# Altium PCB SensWear-V1R1-MainBoard.PcbDoc (part 3 of 3)
Units mm, origin at the board's own origin, x right, y up, seen from the top; angles counter-clockwise.
Board outline 52.5 x 8.5 mm, 4 copper layers (Top Layer, Layer 1, Layer 2, Bottom Layer), stack 0.148 mm thick; 77 components, 63 nets, 291 pads, 132 vias.
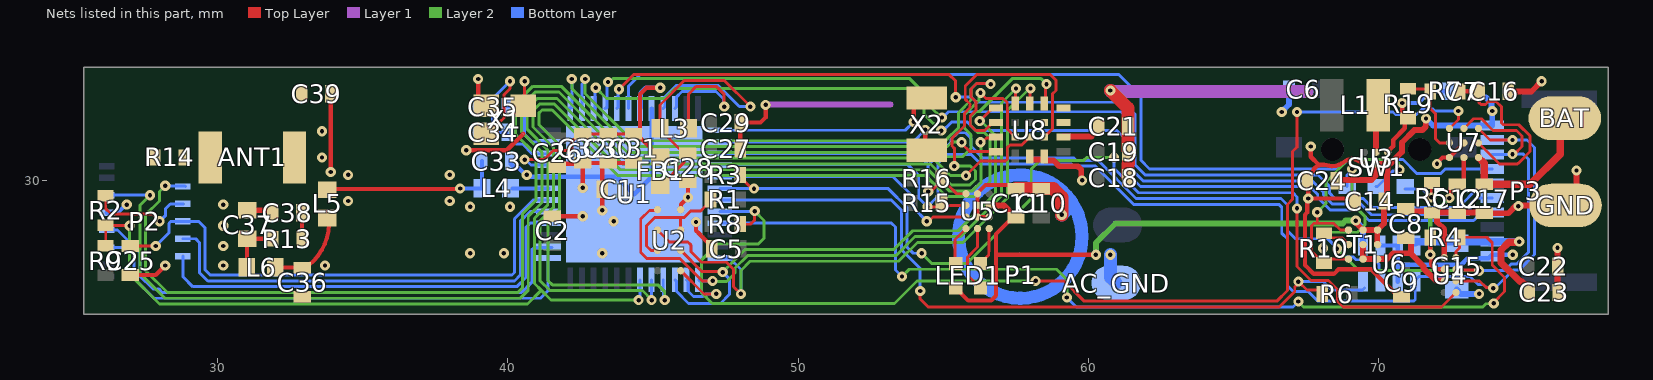
[diagram p4: the nets of this part, all layers, seen from the top]

## Via types
v1: diameter 0.35, hole 0.15, Top Layer to Bottom Layer, tented top, 75 vias
v2: diameter 0.35, hole 0.15, Top Layer to Bottom Layer, tented both sides, 57 vias

## Nets (pads, with @x,y where several pads share a name; then routed paths per layer and width w, separated by ;. In a path a pad name is that pad's centre, name@x,y a point inside that pad or via, vN(x,y) a via of type N, cw(c..) or ccw(c..) an arc to the next point about the centre after c; other vN are vias at no path point) (continued)
CHG_IRQ: R3.2 U1.6 U4.A1 | length 34.3
  Top Layer w0.1: R3.2@48,30.2 48,30.125 48.352,29.773 48.427,29.773 v2(48.475,29.725) ; v1(67.175,29.047) 67.175,27.049 67.659,26.565 68.264,26.565 68.575,26.254 68.575,25.838 68.763,25.65 72.15,25.65 U4.A1@72.65,26.15
  Layer 2 w0.1: v2(54.25,27.5) 54.599,27.151 55.801,27.151 58.025,29.375 58.025,30.4 58.325,30.7 59.835,30.7 59.935,30.8 v2(60.875,30.8)
  Bottom Layer w0.1: U1.6@47.302,29.736 47.307,29.731 48.469,29.731 v2(48.475,29.725) 53.1,29.725 53.75,29.075 53.75,27.708 53.958,27.5 v2(54.25,27.5) ; v2(60.875,30.8) 60.875,30.426 61.716,29.586 67.029,29.586 67.175,29.44 v1(67.175,29.047)
GAUGE_IRQ: R8.2 U1.8 U7.A1 | length 40.5
  Top Layer w0.1: R8.2@48,28.5 48.35,28.5 48.5,28.65 v2(48.5,28.95) ; v2(58.175,26.55) 59.15,26.55 59.85,25.85 66.48,25.85 66.85,26.22 66.85,29.182 67.025,29.357 67.025,31 67.175,31.15 v1(67.175,32.365) ; U7.A1@72.425,31.8 72.733,32.108 v1(72.733,32.4)
  Layer 2 w0.1: v2(48.5,28.95) 48.825,28.625 48.825,28.015 48.635,27.825 47.225,27.825 46.675,27.275 46.675,26.14 47.04,25.775 53.315,25.775 54.09,26.55 v2(58.175,26.55)
  Bottom Layer w0.1: U1.8@47.302,28.936 48.486,28.936 v2(48.5,28.95) ; v1(67.175,32.365) 70.484,32.365 70.574,32.275 71.295,32.275 71.485,32.465 71.86,32.465 71.925,32.4 v1(72.733,32.4)
GND: AC_GND.1 C1.2 C2.2 C5.1 C6.2 C7.1 C8.2 C9.2 C10.1 C11.2 C12.2 C14.1 C15.1 C16.2 C17.2 C18.1 C19.1 C21.2 C22.1 C23.1 C24.2 C25.1 C26.2 C27.2 C28.1 C29.2 C30.1 C31.1 C32.1 C33.2 C34.1 C35.1 C36.1 C37.1 C38.1 C39.2 GND.1 P1.2 P2.7 P3.10 R5.2 R19.2 U1.32 U1.44 U1.49 U2.D1 U3.A1 U3.C2 U4.D2 U5.A3 U5.B1 U5.B2 U5.B3 U6.2 U6.3 U6.6 U7.B2 U7.C1 U8.6 U8.7 X1.2 X1.4 | length 87.1
  Top Layer w0.15: C25.1@27,26.75 27.872,26.75 v1(28.2,27.078) ; C38.1@31.82,28.98 C38.1@31.9,28.9 ; v1@33.9,30.2 C39.2@33.9,33 ; v1(38.564,31.049) 39.593,31.049 39.964,31.049 X1.4@40.527,31.611 ; v1(38.975,33.501) 38.975,32.863 X1.2@39.252,32.586 ; C2.2@41.527,28.776 v1(42.577,28.776) ; C26.2@41.702,30.461 41.827,30.586 42.552,30.586 C32.1@42.577,30.611 ; v1(42.577,29.751) C32.1@42.577,30.611 ; v1(43.252,28.976) C1.2@43.252,29.701 43.252,30.486 C30.1@43.377,30.611 ; C31.1@44.327,30.611 C30.1@43.452,30.611 C30.1@43.377,30.611 ; U2.D1@45.952,29.001 45.962,29.012 45.962,29.186 v1(46.202,29.425) C28.1@46.202,29.951 ; v1(46.477,28.575) 46.477,28.281 46.605,28.153 46.708,28.05 46.883,27.875 46.9,27.875 47.025,27.75 C5.1@47.025,27.65 ; C27.2@48.002,31.101 C29.2@48.002,32.001 48.701,32.001 48.875,32.175 v1(48.875,32.611) ; U5.B2@56.15,29.175 U5.B2@56.175,29.15 ; U5.B1@56.175,29.525 U5.B2@56.175,29.15 ; U5.B1@56.175,29.55 56.175,29.574 56.451,29.85 57.375,29.85 C11.2@57.5,29.725 ; U5.A3@56.55,28.75 U5.B3@56.175,28.75 U5.B2@56.175,29.15 ; v1(67.65,31.177) 67.65,30.825 67.931,30.544 68.115,30.544 68.293,30.51 ccw(c68.4,31.075) 68.694,30.581 68.896,30.701 cw(c69.075,30.4) 69.237,30.71 U3.A1@69.5,30.575 ; 67.936,30.531 ccw(c68.05,30.2) 67.749,30.378 67.65,30.211 C24.2@67.525,30 67.565,29.96 v1(67.565,29.386) ; C14.1@69.175,29.3 69.089,29.386 v1(67.565,29.386) ; U3.C2@70.3,30.975 70.3,31.002 70.489,31.191 70.489,31.401 70.89,31.803 70.89,32.03 R19.2@71,32.14 70.925,32.14 70.8,32.265 70.8,32.353 v1(70.8,32.675) ; C9.2@70.775,26 70.675,26 69.725,26.95 68.607,26.95 68.447,26.79 67.753,26.79 67.45,27.093 67.45,28.828 67.525,28.903 67.525,29.205 67.526,29.206 67.526,29.347 v1(67.565,29.386) ; v1(72,30.579) 72,30.612 72.188,30.8 U7.C1@72.425,30.8 U7.B2@72.925,31.3 ; C32.1@42.577,30.611 C30.1@43.377,30.611
  Top Layer w0.2: C37.1@31.025,28.98 C38.1@31.82,28.98 ; U8.6@57.975,30.837 57.975,30.749 58,30.724 U8.7@58.475,30.724 ; U8.7@58.475,30.837 U8.7@58.475,30.724 ; v1(59.775,30.011) 59.746,30.04 59.746,30.383 59.629,30.5 58.993,30.5 58.793,30.7 58.5,30.7 U8.7@58.475,30.724 ; C8.2@70.925,28.95 R5.2@71.625,28.95 ; R5.2@71.8,28.85 71.95,28.85 72,28.8 72,28.573 72.25,28.323 U4.D2@72.25,27.35 ; R5.2@71.825,28.9 73.6,28.9 C17.2@73.625,28.875 74.456,28.875 74.731,29.15 GND.1@76.425,29.15 76.8,29.525 v1(76.8,30.35) ; C16.2@74.45,33.075 75.25,33.075 v1(75.6,33.425) ; v1(76.15,27.685) C22.1@76.15,27.05 76.15,26.175 C23.1@76.175,26.15
  Top Layer w0.45: C11.2@57.5,29.725 58.787,29.725 59.075,29.437 v1(59.075,28.825) ; v1(60.75,33.105) 61.35,32.505 C21.2@61.35,31.875 61.35,31.032 61.375,31.007 61.375,30.593 61.35,30.568 C18.1@61.35,30.1
  Layer 1 w0.2: v1@48.85,32.625 53.175,32.625
  Layer 1 w0.45: v1(60.75,33.105) 60.78,33.075 67.515,33.075
  Bottom Layer w0.15: P2.7@26.19,28.9 26.575,28.9 v1@26.875,29.2 ; C33.2@40.102,30.676 40.102,30.576 40.227,30.451 40.357,30.451 40.672,30.136 U1.32@41.402,30.136 43.752,30.136 U1.49@44.352,29.536 44.952,30.136 U1.44@44.952,32.486 ; U6.2@70.05,27.77 U6.3@70.65,27.77 70.65,27.105 ; U6.6@70.65,26.525 70.65,27.105 ; v1(70.8,32.675) 71.36,32.675 71.76,33.075 C7.1@72.375,33.075 ; v1(74.605,27.45) 73.9,27.45 73.776,27.326 73.051,27.326 72.83,27.105 70.65,27.105
  Bottom Layer w0.2: v1(66.65,32.365) 66.65,32.37 66.9,32.62 C6.2@66.9,33.15 ; C15.1@72.675,26.25 72.825,26.1 v1(73.45,26.1)
  Bottom Layer w0.45: v1(59.075,28.825) 59.3,29.05 59.475,29.05 ; v1(60.75,27.45) 60.761,27.439 60.761,26.664 AC_GND.1@60.95,26.475
  other v1: 30.2,27.078 33.7,27.078 38.7,27.5 39.864,27.5 43.252,27.5 30.2,27.75 30.2,28.45 43.643,28.602 38.7,29.1 40.075,29.1 74.8,29.125 26.875,29.175 30.2,29.175 34.5,29.3 38,29.3 34.5,30.2 38,30.2 40.65,30.2 33.9,30.3 33.6,30.8 33.6,31.7
LED_EN: U1.5 U5.C3 | length 9.4
  Top Layer w0.1: v1(54.425,28.6) 54.493,28.6 54.643,28.75 U5.C3@55.75,28.75
  Bottom Layer w0.1: U1.5@47.302,30.136 53.264,30.136 53.95,29.45 53.95,29.075 v1(54.425,28.6)
MCU_R\E\S\E\T\: C25.2 P2.6 U1.30 | length 18.7
  Top Layer w0.1: C25.2@27,27.75 v2(27.875,27.75)
  Bottom Layer w0.1: v2(27.875,27.75) 28.333,28.208 28.333,28.532 28.401,28.6 P2.6@28.81,28.6 29.35,28.6 29.575,28.375 29.575,26.925 29.75,26.75 40.14,26.75 40.225,26.835 40.225,28.687 40.875,29.336 U1.30@41.402,29.336
MCU_RX: P2.2 U1.28 | length 15.4
  Bottom Layer w0.1: P2.2@28.81,27.4 28.81,26.69 29.15,26.35 40.306,26.35 40.625,26.669 40.625,28.395 40.767,28.536 U1.28@41.402,28.536
MCU_SWD_CLK: P2.5 U1.26 | length 18
  Bottom Layer w0.1: P2.5@26.19,28.3 26.558,28.3 27.325,27.533 27.325,26.725 27.775,26.275 27.975,26.275 28.1,26.15 40.475,26.15 40.825,26.5 40.825,27.625 40.9,27.7 U1.26@41.526,27.7
MCU_SWD_IO: P2.3 U1.25 | length 17.6
  Bottom Layer w0.1: P2.3@26.19,27.7 26.875,27.7 27.125,27.45 27.125,26.642 27.817,25.95 41.128,25.95 41.377,26.198 41.377,27.311 U1.25@41.402,27.336
MCU_TX: P2.4 U1.29 | length 15.9
  Bottom Layer w0.1: P2.4@28.81,28 29.25,28 29.375,27.875 29.375,26.95 29.375,26.842 29.667,26.55 30,26.55 39.9,26.55 40.223,26.55 40.425,26.752 40.425,27.075 40.425,28.604 40.758,28.936 U1.29@41.392,28.936
MEM_SPI_C\S\: U1.14 U2.A1 | length 3.1
  Top Layer w0.1: U2.A1@45.952,26.901 46.753,26.1 v2(47.175,26.1)
  Bottom Layer w0.1: U1.14@46.152,26.586 46.202,26.536 46.202,26.198 46.389,26.011 46.714,26.011 46.803,26.1 v2(47.175,26.1)
MPU_CLK: U1.12 U2.C2 U8.13 | length 21.6
  Top Layer w0.1: U2.C2@45.152,28.301 45.563,27.89 46.202,27.89 46.302,27.79 46.302,27.56 46.669,27.192 47.533,27.192 47.775,26.95 47.775,26.35 v2(48.025,26.1) ; U8.13@57.975,32.687 57.988,32.699 57.988,33.163 v2(58,33.175)
  Layer 2 w0.1: v2(48.025,26.1) 48.025,26.909 48.341,27.225 48.883,27.225 53.458,27.225 54.108,27.875 55.676,27.875 57.2,29.399 57.2,32.415 57.96,33.175 v2(58,33.175)
  Bottom Layer w0.1: U1.12@47.302,27.336 47.627,27.336 48.025,26.938 v2(48.025,26.1)
MPU_CS#: U1.16 U8.12 | length 35
  Top Layer w0.1: U8.12@58.475,32.687 58.512,32.724 58.512,33.288 v2(58.55,33.325)
  Layer 2 w0.1: v2(45.402,25.888) 45.402,26.173 45.162,26.413 41.53,26.413 41.377,26.566 41.377,28.602 41.775,29 41.775,31.225 41.067,31.933 41.067,32.325 41.176,32.434 41.526,32.434 43.785,30.175 53.668,30.175 53.672,30.172 54.388,30.172 55.11,29.45 55.878,29.45 56.075,29.45 56.6,29.975 56.6,31.46 56.41,31.65 56.19,31.65 55.925,31.915 55.925,32.185 56.115,32.375 56.234,32.375 57.384,33.525 58.35,33.525 v2(58.55,33.325)
  Bottom Layer w0.1: U1.16@45.352,26.586 45.352,25.938 v2(45.402,25.888)
MPU_GPIO0: U1.38 U8.2 | length 20.8
  Top Layer w0.1: v2@56.625,33.35 56.14,33.35 55.95,33.16 55.95,32.89 56.116,32.724 56.116,32.415 55.925,32.224 55.925,31.915 56.115,31.725 56.425,31.725 56.7,32 U8.2@56.812,32
  Layer 2 w0.1: v2(42.66,33.501) 42.66,32.998 44.282,31.375 55.06,31.375 55.289,31.604 55.296,31.604 55.525,31.834 55.525,32.35 55.95,32.775 55.95,33.16 56.14,33.35 v2@56.625,33.35
  Bottom Layer w0.1: U1.38@42.55,32.488 42.55,32.86 42.552,32.861 42.552,33.325 42.66,33.433 v2(42.66,33.501)
  other v2: 56.625,33.325
MPU_GPIO1: U1.17 U8.3 | length 30
  Top Layer w0.1: v2(56.275,31.325) 56.343,31.325 56.485,31.467 56.641,31.467 U8.3@56.675,31.5
  Layer 2 w0.1: v2(44.952,25.888) 44.952,25.897 44.636,26.213 41.448,26.213 41.113,26.547 41.113,28.621 41.575,29.083 41.575,31.142 40.867,31.851 40.867,32.408 41.093,32.634 41.609,32.634 43.868,30.375 54.475,30.375 55.2,29.65 55.569,29.65 55.795,29.65 55.992,29.65 56.3,29.958 56.3,30.155 56.3,30.381 56.3,31.3 v2(56.275,31.325)
  Bottom Layer w0.1: v2@44.95,25.786 44.952,25.788 v2(44.952,25.888) U1.17@44.952,26.586
MPU_GPIO2: U8.10
MPU_GPIO3: U8.11
MPU_GPIO4: U8.18
MPU_IRQ#: U1.37 U8.4 | length 17
  Top Layer w0.1: v2(55.625,31.325) 55.625,31.28 55.905,31 U8.4@56.787,31
  Layer 2 w0.1: v2(42.203,33.501) 42.203,33.172 44.199,31.175 55.142,31.175 55.292,31.325 v2(55.625,31.325)
  Bottom Layer w0.1: U1.37@42.127,32.511 U1.37@42.152,32.486 ; U1.37@42.202,32.511 v2@42.202,33.477
MPU_MISO: U1.15 U2.B1 U8.1 | length 19.2
  Top Layer w0.1: U2.B1@45.952,27.601 46.678,26.875 47.375,26.875 v2(47.4,26.85) ; v2(56.25,32.05) 56.625,32.425 56.7,32.5 U8.1@56.812,32.5
  Layer 2 w0.1: v2(47.4,26.85) 48.175,27.625 53.292,27.625 53.942,28.275 55.511,28.275 56.8,29.564 56.8,31.542 56.292,32.05 v2@56.258,32.05
  Bottom Layer w0.1: U1.15@45.752,26.586 45.802,26.536 45.802,26.198 46.225,25.775 47.325,25.775 47.627,26.077 47.627,26.623 v2(47.4,26.85)
MPU_MOSI: U1.13 U2.D2 U8.14 | length 21
  Top Layer w0.1: U2.D2@45.152,29.026 45.102,28.976 44.877,28.976 44.577,28.676 44.577,27.526 44.777,27.326 45.915,27.326 46.692,26.55 v2(47.05,26.55) ; U8.14@57.475,32.687 57.487,32.699 57.487,33.163 v2(57.5,33.175)
  Layer 2 w0.1: v2@47.025,26.55 47.05,26.525 47.535,26.525 47.825,26.815 47.825,26.992 48.258,27.425 53.375,27.425 54.025,28.075 55.594,28.075 57,29.481 57,29.809 57,32.675 v2(57.5,33.175)
  Bottom Layer w0.1: U1.13@46.577,26.675 46.577,26.575 46.602,26.55 v2(47.05,26.55)
MPU_R\E\S\E\T\: R2.1 R9.2 U1.18 U8.17 | length 55.6
  Top Layer w0.1: R9.2@26.15,27.76 R2.1@26.15,28.465 26.165,28.45 v2@26.95,28.45 ; v2(55.375,30.5) 55.375,31.115 55.3,31.19 55.3,31.46 55.725,31.885 55.725,32.325 55.916,32.516 55.916,32.641 55.75,32.808 55.75,33.265 56.135,33.65 58.685,33.65 58.875,33.46 58.875,33.105 58.751,32.98 58.751,31.775 U8.17@58.475,31.5
  Layer 2 w0.1: v2(26.975,28.45) 26.975,26.775 28,25.75 40.675,25.75 41.151,26.226 ; v2(44.502,25.888) 41.49,25.888 41.151,26.226 ; v2(55.375,30.5) 55.936,30.5 56.1,30.336 56.1,30.238 56.1,30.04 55.91,29.85 55.712,29.85 55.283,29.85 54.558,30.575 43.951,30.575 41.692,32.834 41.01,32.834 40.667,32.491 40.667,31.768 41.375,31.059 41.375,29.166 40.913,28.704 40.913,26.464 41.151,26.226
  Bottom Layer w0.1: v2(44.502,25.888) 44.552,25.938 U1.18@44.552,26.586
MPU_SWD_CLK: P2.10 U8.15 | length 45.7
  Top Layer w0.1: v2(56.275,33.025) 56.468,32.832 57.054,32.832 57.2,32.687 57.2,32.425 ; 57.2,32.425 57.2,31.775 57.45,31.525 U8.15@57.475,31.525
  Layer 2 w0.1: v2(28.2,29.825) 28,29.625 28,29.3 27.525,28.825 27.525,26.9 28.275,26.15 40.342,26.15 40.502,26.31 40.502,28.858 40.975,29.331 40.975,30.894 40.267,31.602 40.267,32.656 40.86,33.25 41.842,33.25 44.117,30.975 54.948,30.975 55.098,30.825 55.66,30.825 55.95,31.115 55.95,31.579 55.725,31.804 55.725,32.267 56.227,32.77 56.227,32.977 v2(56.275,33.025)
  Bottom Layer w0.1: v2(28.2,29.825) 28.212,29.813 28.887,29.813 P2.10@28.9,29.8
MPU_SWD_DIO: P2.9 U8.16 | length 44.7
  Top Layer w0.1: v2(55.775,30.175) 56.275,30.675 57.141,30.675 57.2,30.733 57.2,31.136 57.288,31.225 57.7,31.225 U8.16@57.975,31.5
  Layer 2 w0.1: v2(27.675,29.5) 27.325,29.15 27.325,26.817 28.192,25.95 40.425,25.95 40.702,26.227 40.702,28.775 41.175,29.249 41.175,30.976 40.467,31.685 40.467,32.574 40.943,33.05 41.759,33.05 44.034,30.775 54.64,30.775 55.24,30.175 v2(55.775,30.175)
  Bottom Layer w0.1: P2.9@26.19,29.5 v2(27.675,29.5)
NetANT1_1: ANT1.1 C38.2 C39.1 R13.2 R14.1 | length 0.9
  Top Layer w0.14: C38.2@32.9,28.9 32.91,28.89 R13.2@32.91,27.985
NetANT1_2: ANT1.2 R14.2
NetC16_1: C16.1 R7.2 U7.B3 | length 6.5
  Top Layer w0.1: U7.B3@73.425,31.3 74.15,30.575 74.772,30.575 74.797,30.6 74.806,30.6 74.997,30.79 74.997,30.8 75.197,31 75.197,31.544 74.814,31.926 74.284,31.926 74.225,31.985 74.225,32.535 74.035,32.725 73.765,32.725 73.667,32.626 73.509,32.626 73.45,32.685 C16.1@73.45,33.075
  Top Layer w0.15: R7.2@72.785,33.075 C16.1@73.45,33.075
NetC21_1: C21.1 U8.9 | length 1.2
  Top Layer w0.2: U8.9@59.138,31.525 60.1,31.525 60.25,31.675 C21.1@60.25,31.75
NetC28_2: C28.2 FB1.2 L3.1 U1.45 | length 11.2
  Top Layer w0.1: FB1.2@45.252,29.836 45.282,29.836 46.059,30.614 46.059,31.009 C28.2@46.077,31.026 ; C28.2@46.077,31.076 45.932,31.076 45.237,31.771 L3.1@45.237,31.801 45.237,32.611 46.075,33.45 47.453,33.45 v2(48.352,32.551)
  Bottom Layer w0.1: U1.45@45.352,32.486 45.402,32.536 45.402,32.876 45.8,33.275 47.247,33.275 47.971,32.551 v2(48.352,32.551)
NetC30_2: C30.2 C31.2 C32.2 FB1.1 U1.33 U1.43 | length 9.9
  Top Layer w0.1: v2(40.577,30.726) 41.254,30.726 41.563,31.035 42.136,31.035 42.203,31.101 42.203,31.337 42.477,31.611 C30.2@43.452,31.611 44.217,31.611 C31.2@44.327,31.611
  Top Layer w0.15: C31.2@44.102,31.486 44.217,31.601 C31.2@44.227,31.601 ; C31.2@44.482,31.556 44.552,31.486 45.222,30.816 FB1.1@45.252,30.816 ; C31.2@44.527,31.601 44.552,31.626 44.552,32.977 44.775,33.2 v2(45.25,33.2)
  Bottom Layer w0.1: v2(40.577,30.726) 40.603,30.726 40.793,30.536 U1.33@41.402,30.536
  Bottom Layer w0.15: U1.43@44.552,32.486 44.577,32.511 44.577,33.027 44.75,33.2 v2(45.25,33.2)
NetC33_1: C33.1 L4.2 L5.1 | length 6.2
  Top Layer w0.14: L5.1@33.775,29.715 v2@38.34,29.715
  Bottom Layer w0.14: v2(38.357,29.731) L4.2@39.107,29.731 ; L4.2@39.107,29.771 C33.1@39.107,30.671
NetC34_2: C34.2 U1.34 X1.3 | length 6.5
  Top Layer w0.1: X1.3@39.252,31.611 39.302,31.611 39.739,32.049 39.751,32.049 39.864,32.161 39.864,32.961 40.072,33.169 40.072,33.422 v2(40.075,33.425)
  Bottom Layer w0.1: v2(40.075,33.425) 39.477,32.827 39.477,31.761 39.577,31.661 C34.2@39.977,31.661 39.977,31.561 40.277,31.261 40.502,31.261 40.836,30.926 U1.34@41.452,30.926
NetC35_2: C35.2 U1.35 X1.1 | length 4.2
  Top Layer w0.1: X1.1@40.527,32.586 40.577,32.636 v2(40.577,33.426)
  Bottom Layer w0.1: C35.2@39.977,32.551 40.577,32.551 ; v2(40.577,33.426) 40.577,32.551 ; U1.35@41.402,31.336 40.842,31.336 40.577,31.601 40.577,32.551
NetC36_2: C36.2 L5.2 L6.1 | length 3
  Top Layer w0.14: L6.1@32.002,27.013 C36.2@32.925,27.013 ; C36.2@32.925,27 33.155,27.096 ccw(c31.922,28.568) 33.841,28.49 L5.2@33.775,28.76
NetC37_2: C37.2 L6.2 R13.1 | length 1.8
  Top Layer w0.14: L6.2@31.01,27.025 31.017,27.033 31.017,27.942 C37.2@31.025,27.95 ; C37.2@31.025,28 R13.1@31.9,28
NetL1_1: L1.1 U3.B2 | length 1.9
  Top Layer w0.15: L1.1@69.9,32.85 L1.1@69.925,32.875
  Top Layer w0.2: U3.B2@69.9,30.975 L1.1@69.9,32.85
NetL3_2: L3.2 U1.46 | length 5.6
  Top Layer w0.1: L3.2@46.217,31.801 46.217,32.977 46.49,33.25 47.177,33.25 47.45,32.977 v2(47.45,32.55)
  Bottom Layer w0.1: U1.46@45.752,32.486 45.802,32.536 45.802,32.876 46,33.075 47.164,33.075 47.424,32.815 47.424,32.576 v2(47.45,32.55)
NetL4_1: L4.1 U1.31 | length 1.2
  Bottom Layer w0.14: L4.1@40.162,29.736 U1.31@41.402,29.736
NetLED1_2: LED1.2 U5.C4 | length 1.4
  Top Layer w0.1: LED1.2@55.4,27.15 55.4,27.975 U5.C4@55.775,28.35
NetLED1_3: LED1.3 U5.A4 | length 1.3
  Top Layer w0.1: LED1.3@56.275,27.15 56.562,27.437 56.562,27.562 56.575,27.575 U5.A4@56.575,28.35
NetLED1_4: LED1.4 U5.B4 | length 2.4
  Top Layer w0.1: U5.B4@56.175,28.35 56.175,27.712 55.825,27.362 55.825,26.75 56.25,26.325 LED1.4@56.25,26.3
NetP2_8: P2.8 R2.2 | length 3.7
  Top Layer w0.1: R2.2@26.15,29.485 26.15,29.03 26.33,28.85 27.758,28.85 v2(28.008,28.6)
  Bottom Layer w0.1: v2(28.008,28.6) 28.215,28.807 28.215,29.04 28.375,29.2 P2.8@28.825,29.2
NetR1_1: R1.1 U2.B2 U2.C1 | length 4.2
  Top Layer w0.1: U2.B2@45.152,27.601 44.927,27.601 44.777,27.751 44.777,28.451 45.052,28.726 45.952,28.726 ; U2.C1@45.952,28.301 45.952,28.726 ; R1.1@47.03,29.35 47.03,29.325 46.83,29.125 46.805,29.125 46.63,28.95 46.289,28.95 46.065,28.726 45.952,28.726
NetR5_1: R5.1 SW1.2 | length 1.5
  Top Layer w0.1: v1(71.8,29.425) 71.8,29.895 R5.1@71.825,29.92
  Bottom Layer w0.1: SW1.2@70.9,29.72 71.48,29.72 v1@71.8,29.4
NetR7_1: R7.1 R19.1 U7.B1 | length 3
  Top Layer w0.1: R19.1@71,33.16 71.68,33.16 R7.1@71.765,33.075 71.765,32.49 71.95,32.305 71.95,31.442 72.092,31.3 U7.B1@72.425,31.3
NetR10_1: R10.1 SW1.C T1.A1 T1.C1 | length 9.3
  Top Layer w0.1: v1(67.875,28.913) 67.875,28.535 ; R10.1@68,27.15 67.875,27.275 67.875,27.371 67.675,27.571 67.675,28.447 67.763,28.535 67.875,28.535 ; R10.1@68.2,27.2 68.3,27.3 T1.C1@68.95,27.3 ; T1.A1@68.95,28.3 68.672,28.3 68.437,28.535 67.875,28.535
  Layer 2 w0.1: v1(67.875,28.913) 68.172,29.21 68.172,29.956 68.94,30.725 70.544,30.725 70.67,30.599 70.67,30.417 v1(70.709,30.378)
  Bottom Layer w0.1: SW1.C@69.9,29.795 69.945,29.795 70.489,30.339 70.67,30.339 v1(70.709,30.378)
NetR10_2: R10.2 SW1.1 T1.B1 | length 6.2
  Top Layer w0.1: v1@68.1,27.65 R10.2@68.1,28.185 ; R10.2@68.15,28.05 68.165,28.035 68.715,28.035 T1.B1@68.95,27.8
  Layer 2 w0.1: v1@68.1,27.675 68.1,28.075 68.25,28.225 69.26,28.225 69.525,28.49 69.525,28.76 69.075,29.21 v1(69.075,30.4)
  Bottom Layer w0.1: SW1.1@68.9,29.795 68.9,30.2 69.075,30.375 v1(69.075,30.4)
  other v1: 68.075,27.675
NetU1_1: U1.1 X2.2 | length 8.2
  Top Layer w0.1: X2.2@54.425,32.825 X2.2@54.625,32.625
  Top Layer w0.15: v2(53.975,32.025) 53.975,32.625 54.05,32.7 X2.2@54.05,33.075
  Bottom Layer w0.1: U1.1@47.302,31.736 53.686,31.736 53.95,32 v2@54.025,32
NetU1_2: U1.2 X2.1 | length 8
  Top Layer w0.1: X2.1@53.875,30.825 X2.1@53.925,30.775
  Top Layer w0.15: v2(54.375,31.75) 54.375,31.125 X2.1@54.425,31.075
  Bottom Layer w0.1: U1.2@47.302,31.336 53.961,31.336 54.35,31.725 v2@54.375,31.725
  Bottom Layer w0.15: v2@54.362,31.737 v2(54.375,31.75)
PWR_I2C_SCL: P3.2 R15.2 U1.4 U4.B1 U5.C2 U6.5 U7.A3 | length 44.8
  Top Layer w0.1: v1(54.45,29.1) 54.975,29.1 R15.2@55,29.075 ; R15.2@55,29.175 55.025,29.15 U5.C2@55.775,29.15 ; U4.B1@72.65,26.55 73.46,26.55 73.693,26.317 73.918,26.317 v1(73.935,26.3) ; U7.A3@73.425,31.8 73.824,31.401 v1@74.672,31.401
  Bottom Layer w0.1: U1.4@47.302,30.536 47.317,30.551 53.774,30.551 54.15,30.175 54.15,29.4 v1(54.45,29.1) 54.818,29.468 54.818,30.593 55.125,30.9 55.958,30.9 56.283,30.575 59.408,30.575 59.483,30.5 60.236,30.5 61.55,29.186 66.546,29.186 66.65,29.082 66.65,28.19 66.85,27.99 66.85,26.382 67.049,26.183 67.565,26.183 67.898,25.85 71.191,25.85 71.25,25.909 U6.5@71.25,26.425 ; U6.5@71.25,26.525 71.25,26.573 71.377,26.7 73.137,26.7 73.412,26.425 73.585,26.425 73.693,26.317 73.918,26.317 v1(73.935,26.3) 74,26.3 74.625,26.925 74.813,26.925 74.838,26.95 74.847,26.95 75.356,27.458 75.356,31.141 75.097,31.4 P3.2@73.9,31.4
  other v1: 74.597,31.401
PWR_I2C_SDA: P3.3 R16.2 U1.3 U4.C1 U5.C1 U6.7 U7.A2 | length 44.8
  Top Layer w0.1: v1(54.475,29.625) 54.523,29.673 54.608,29.673 54.925,29.99 R16.2@54.925,30.075 ; R16.2@54.935,30.075 54.935,30 55.085,29.85 55.16,29.85 55.46,29.55 U5.C1@55.775,29.55 ; U4.C1@72.65,26.95 72.675,26.925 73.425,26.925 v1(73.45,26.9) ; U7.A2@72.925,31.8 73.257,32.132 73.526,32.132 73.931,31.726 74.731,31.726 74.922,31.536 74.922,31.175 74.66,30.913 v1(74.597,30.913)
  Layer 2 w0.1: v1(68.552,27.658) 69.31,26.9 v1(73.45,26.9)
  Bottom Layer w0.1: U1.3@47.302,30.936 47.312,30.926 54.09,30.926 54.475,30.541 ; v1(54.475,29.625) 54.475,30.541 ; U6.7@70,26.675 70,27.125 69.848,27.277 69.211,27.277 69.123,27.365 68.869,27.365 68.235,28 67.123,28 66.85,28.273 66.85,29.165 66.629,29.386 61.633,29.386 60.319,30.7 59.565,30.7 59.49,30.775 56.365,30.775 55.95,31.19 55.95,31.46 55.76,31.65 55.49,31.65 55.262,31.422 55.262,31.328 54.475,30.541 ; v1(73.45,26.9) 74.317,26.9 74.542,27.125 74.74,27.125 75.156,27.541 75.156,30.726 74.969,30.913 v1(74.597,30.913) 74.584,30.9 P3.3@73.9,30.9
PWR_K\I\L\L\: R4.1 U1.9 U4.D1 | length 33.9
  Top Layer w0.1: U4.D1@72.65,27.35 72.655,27.355 72.655,27.565 72.775,27.685 R4.1@72.775,28.1 ; R4.1@72.785,28.05 73.711,28.05 73.9,27.861 73.9,27.093 74.325,26.668 74.325,26.184 73.95,25.809 v1(73.95,25.775)
  Layer 2 w0.1: v2(53.575,26.7) 53.826,26.951 58.899,26.951 59.25,26.6 v2(59.25,25.975) ; v1(67.223,25.838) 67.223,25.827 67.4,25.65 73.575,25.65 73.685,25.76 v1@73.935,25.76
  Bottom Layer w0.1: U1.9@47.302,28.536 53.214,28.536 53.35,28.4 53.35,26.925 v2(53.575,26.7) ; v2(59.25,25.975) 59.575,25.65 67.035,25.65 v1(67.223,25.838) ; v1@73.935,25.76 v1(73.95,25.775)
SENSOR_GPIO_0: P3.4 U1.42 | length 33.7
  Bottom Layer w0.1: U1.42@44.152,32.486 44.152,33.252 44.275,33.375 44.55,33.65 61.05,33.65 61.8,32.9 61.8,30.7 62.1,30.4 67.983,30.4 68.503,30.4 68.704,30.601 68.816,30.601 68.94,30.725 70.822,30.725 71.293,30.254 72.135,30.254 72.281,30.4 P3.4@73.9,30.4
SENSOR_GPIO_1: P3.5 U1.41 | length 34.7
  Top Layer w0.1: v2(43.825,33.15) 44.325,33.65 55.2,33.65 55.422,33.428 55.422,32.878 v2(55.425,32.875)
  Bottom Layer w0.1: U1.41@43.752,32.486 43.796,32.53 43.796,33.121 v2(43.825,33.15) ; v2(55.425,32.875) 55.965,32.875 56.14,32.7 61.2,32.7 61.6,32.3 61.6,30.55 61.95,30.2 67.9,30.2 68.29,29.811 68.29,29.585 68.485,29.39 69.46,29.39 69.771,29.079 69.775,29.075 72.729,29.075 72.733,29.079 73.429,29.775 73.775,29.775 P3.5@73.9,29.9
SENSOR_GPIO_2: P3.6 U1.40 | length 35.1
  Layer 2 w0.1: v2(43.45,33.4) 43.518,33.4 43.643,33.525 53.825,33.525 54.525,32.825 54.525,32.575 v2@54.95,32.15
  Bottom Layer w0.1: U1.40@43.352,32.486 U1.40@43.363,32.498 ; v2@43.363,33.388 v2@43.375,33.4 ; U1.40@43.413,32.498 v2@43.413,33.388 ; v2@54.95,32.15 55.175,32.375 61.125,32.375 61.4,32.1 61.4,30.467 61.872,29.995 67.698,29.995 68.09,29.603 68.09,29.503 68.402,29.19 69.377,29.19 69.742,28.825 73.079,28.825 73.137,28.884 73.137,29.2 73.337,29.4 P3.6@73.9,29.4
  other v2: 54.95,32.175
SENSOR_GPIO_3: P3.7 U1.39 | length 35.1
  Layer 2 w0.1: v2(43.025,33.2) 43.4,32.825 45.4,32.825 45.75,33.175 53.892,33.175 54.325,32.742 54.325,32.3 v2@54.925,31.7
  Bottom Layer w0.1: U1.39@42.95,32.488 U1.39@42.952,32.486 ; U1.39@43,32.488 v2@43,33.175 ; v2@54.925,31.7 54.96,31.7 55.275,32.015 55.825,32.015 56.115,31.725 60.975,31.725 61.2,31.5 61.2,30.384 61.789,29.795 67.615,29.795 67.89,29.52 67.89,29.42 68.319,28.99 69.295,28.99 69.66,28.625 73.261,28.625 73.411,28.775 73.8,28.775 P3.7@73.925,28.9
  other v2: 54.925,31.725
V_BAT: C12.1 R4.2 U4.C2 U7.C2 | length 5.4
  Top Layer w0.15: R4.2@71.765,28.04 v1(71.766,27.455) 71.804,27.417 71.804,27.101 71.955,26.95 U4.C2@72.25,26.95 ; v1(72.425,29.4) 72.425,29.454 72.475,29.504 72.475,29.75 72.6,29.875 72.8,29.875 72.925,30 U7.C2@72.925,30.8
  Layer 2 w0.15: v1(71.766,27.455) 71.766,28.741 v1(72.425,29.4)
V_BAT+: BAT.1 C17.1 U7.C3 | length 5.4
  Top Layer w0.25: U7.C3@73.425,30.8 73.625,30.6 C17.1@73.625,29.875 75.2,29.875 76.238,30.913 76.238,31.988 BAT.1@76.4,32.15
V_REG_EN: R6.2 U1.7 U6.8 | length 26.6
  Top Layer w0.1: v2(54.2,26.2) 54.2,25.925 54.475,25.65 66.434,25.65 66.563,25.65 67.098,26.185 67.098,26.313 67.098,26.341 67.223,26.466 v2(67.223,26.525) 67.252,26.496 67.516,26.231 R6.2@67.959,26.231
  Bottom Layer w0.1: U1.7@47.302,29.336 53.206,29.336 53.55,28.992 53.55,27.625 54.2,26.975 v2(54.2,26.2) ; v2(67.223,26.525) 68.083,26.525 68.376,26.233 69.433,26.233 U6.8@69.5,26.3
V_REG_IO: C15.2 C23.2 P3.9 U6.4 | length 6.3
  Top Layer w0.25: v1(74.831,27.9) 74.812,27.881 74.47,27.881 74.205,27.616 74.205,27.177 74.857,26.525 74.9,26.525 75.175,26.25 C23.2@75.175,26.15
  Bottom Layer w0.25: U6.4@71.2,27.9 U6.4@71.25,27.85 ; U6.4@71.25,27.9 P3.9@73.85,27.9 ; P3.9@73.85,27.85 P3.9@73.9,27.9 v1(74.831,27.9)
V_SYS: C7.2 C11.1 C14.2 C24.1 LED1.1 P3.1 T1.D1 U3.B1 U3.C1 U5.A2 U6.1 | length 32
  Top Layer w0.15: LED1.1@55.425,26.3 55.85,25.875 55.9,25.875 56.65,25.875 56.812,26.037 56.812,27.45 ; C11.1@57.225,28.575 56.812,28.162 56.812,27.45 ; C11.1@57.275,28.6 57.4,28.725 C11.1@57.4,28.75 ; v1(60.25,27.45) 56.812,27.45
  Top Layer w0.2: U5.A2@56.575,29.15 57.075,29.15 57.398,28.827 57.398,28.825 57.411,28.813 57.413,28.813 C11.1@57.5,28.725 ; C24.1@68.525,30 68.6,30 68.625,30.025 69.739,30.025 69.9,30.186 U3.B1@69.9,30.575 U3.C1@70.3,30.575 70.3,30.226 70.275,30.201 70.275,29.4 C14.2@70.2,29.325 ; v2(69.2,28.625) 69.229,28.596 69.229,28.521 T1.D1@69.45,28.3 T1.D1@69.939,28.3 ; T1.D1@69.95,27.8 69.939,27.811 T1.D1@69.939,28.3 ; C14.2@70.175,29.3 70.175,28.525 T1.D1@69.95,28.3 T1.D1@69.939,28.3 ; U3.C1@70.317,30.579 70.323,30.585 70.385,30.585 70.793,30.992 70.793,31.317 71.216,31.74 71.494,31.74 71.611,31.857 71.611,32.132 v1(71.62,32.14)
  Layer 2 w0.2: v1(60.25,27.45) 60.25,27.85 60.925,28.525 68.75,28.525 68.85,28.625 v2(69.2,28.625)
  Bottom Layer w0.2: v2(69.2,28.625) 69.2,28.623 69.45,28.373 U6.1@69.45,27.77 ; v1(71.62,32.14) 71.86,31.9 P3.1@73.9,31.9 v1(73.9,32.4) 73.871,32.429 73.871,32.679 73.675,32.875 73.475,32.875 73.375,32.975 C7.2@73.375,33.075
V_SYS_OUT: C8.1 T1.D2 U4.B2 | length 4.4
  Top Layer w0.2: T1.D2@69.45,27.8 T1.D2@69.45,27.3 70.28,27.3 70.48,27.5 71.05,27.5 ; C8.1@70.95,28.075 71.1,27.925 71.1,27.483 71.528,27.055 71.528,26.988 71.956,26.56 72.227,26.56 U4.B2@72.236,26.55
pads on no net: P2.P1 P2.P2 P3.0 SW1. SW1.S1 SW1.S2 U1.11 U1.19 U1.20 U1.21 U1.23 U1.24 U1.27 U5.A1 U8.19 U8.20

## Polygon pours and split planes (outlines as drawn)
GND on Layer 1 "GND_L02_P001" (solid, remove dead copper, pour order 1): 66.5,33.825 77.675,33.825 77.675,25.4 66.5,25.4
GND on Layer 1 "GND_L02_P003" (solid, remove dead copper, pour order 3): 38.35,33.9 49.175,33.9 49.175,25.4 38.35,25.4
GND on Layer 1 "GND_L02_P002" (solid, remove dead copper, pour order 2): 52.8,33.9 61.5,33.9 61.5,25.425 52.8,25.425
GND on Layer 2 "GND_L03_P005" (solid, pour order 6): 25.4,33.9 33.9,33.9 33.9,30.4 38.9,30.4 38.9,29.1 33.9,29.1 33.9,26.238 25.4,26.238
GND on Layer 2 "GND_L03_P004" (solid, remove dead copper, pour order 4): 38.357,33.925 42.092,33.925 42.092,25.425 38.357,25.425
GND on Bottom Layer "GND_L04_P006" (solid, remove dead copper, pour order 8): 38.357,33.9 42.7,33.9 42.7,25.4 38.357,25.4
GND on Top Layer "GND_L01_P000" (solid, remove dead copper, pour order 7): 25.4,33.9 33.9,33.9 33.9,30.4 38.9,30.4 38.9,29.1 33.9,29.1 33.9,25.4 25.4,25.4

## Other copper
Top Layer:
  pour cut-out: 25.39,33.9 33.4,33.853 33.4,29.575 25.411,29.575
  region net NetANT1_1: 33.15,28.9 33.15,33.4 25.65,33.4 25.65,30.3 28.25,30.3 28.25,31.1 26.45,31.1 26.45,32.6 32.65,32.6 32.65,28.9
  region net NetANT1_2: 28.75,30.3 29.95,30.3 29.95,31.1 28.75,31.1
  region net GND: 40.389,31.999 40.089,31.699 40.089,31.224 40.964,31.224 40.964,31.999
Layer 2:
  pour cut-out: 25.39,33.9 33.4,33.853 33.4,29.575 25.411,29.575
Bottom Layer:
  region net GND: 57.7,25.7 ccw(c57.7,25.95) 57.95,25.95 ccw(c57.7,25.95) 57.7,26.2 ccw(c57.7,25.95) 57.45,25.95 ccw(c57.7,25.95)
  region net CHG_AC: 57.625,27.275 ccw(c57.625,27.525) 57.875,27.525 ccw(c57.625,27.525) 57.625,27.775 ccw(c57.625,27.525) 57.375,27.525 ccw(c57.625,27.525)

## Silkscreen, mask and mechanical layers (free items; w line width, h text height)
Top Overlay:
  drawing of 3 lines, arcs and shapes, not listed
  text "+" at 74.13,31.476 h1
  text "-" at 74.275,28.625 h1
  text "Hub" at 63.5,26.725 h1.85 r90
  text "Board" at 65.025,26.725 h1.85 r90
  text "SensWear" at 52.35,25.625 h1.85 r90
Bottom Overlay:
  drawing of 24 lines, arcs and shapes, not listed
  text "V1.1.C0" at 62.075,32.836 h1
  text "1" at 70.925,31.2 h1 r90
  text "+" at 62.675,28.158 h1
  text "AC" at 64.25,27.15 h1
  text "-" at 62.75,26.15 h1
  text "1" at 26.745,25.945 h1 r90
Mechanical 1:
  the board outline again, w0.1
Top Assembly:
  lines w0.1: 25.4,24.3 25.4,34.3 ; 33.9,24.5 33.9,35.9 ; 39.4,25 39.4,36 ; 47.9,25 47.9,35.3 ; 53.4,23.8 53.4,34.9 ; 61.9,24 61.9,34 ; 67.4,24 67.4,34 ; 77.9,23 77.9,33

## Dimensions
77.9,25.4 to 77.9,33.9 on Top Assembly
47.9,35.3 to 53.4,34.9 on Top Assembly
33.9,35.9 to 39.4,36 on Top Assembly
39.4,25 to 47.9,25 on Top Assembly
25.4,24.3 to 33.9,24.5 on Top Assembly
25.4,34.3 to 77.9,33 on Top Assembly
61.9,34 to 67.4,34 on Top Assembly
61.9,24 to 53.4,23.8 on Top Assembly
67.4,24 to 77.9,23 on Top Assembly